# Altium PCB MainBoardPCB_PWR.PcbDoc (part 28 of 29)
Units mm, origin at the board's own origin, x right, y up, seen from the top; angles counter-clockwise.
Board outline 333.63 x 349.38 mm, 16 copper layers (L1, L2 (GND), L3 (Sign), L4 (GND), L5 (Sign), L6 (PWR/GND), L7(PWR/GND), L8 (PWR/GND), L9 (PWR/GND), L10 (PWR/GND), L11 (PWR/GND), L12 (Sign), L13 (GND), L14 (Sign), L15 (GND), L16), stack 2.503 mm thick; 2187 components, 1615 nets, 7987 pads, 1695 vias.
Unrouted connection lines stored in the file: 4757.
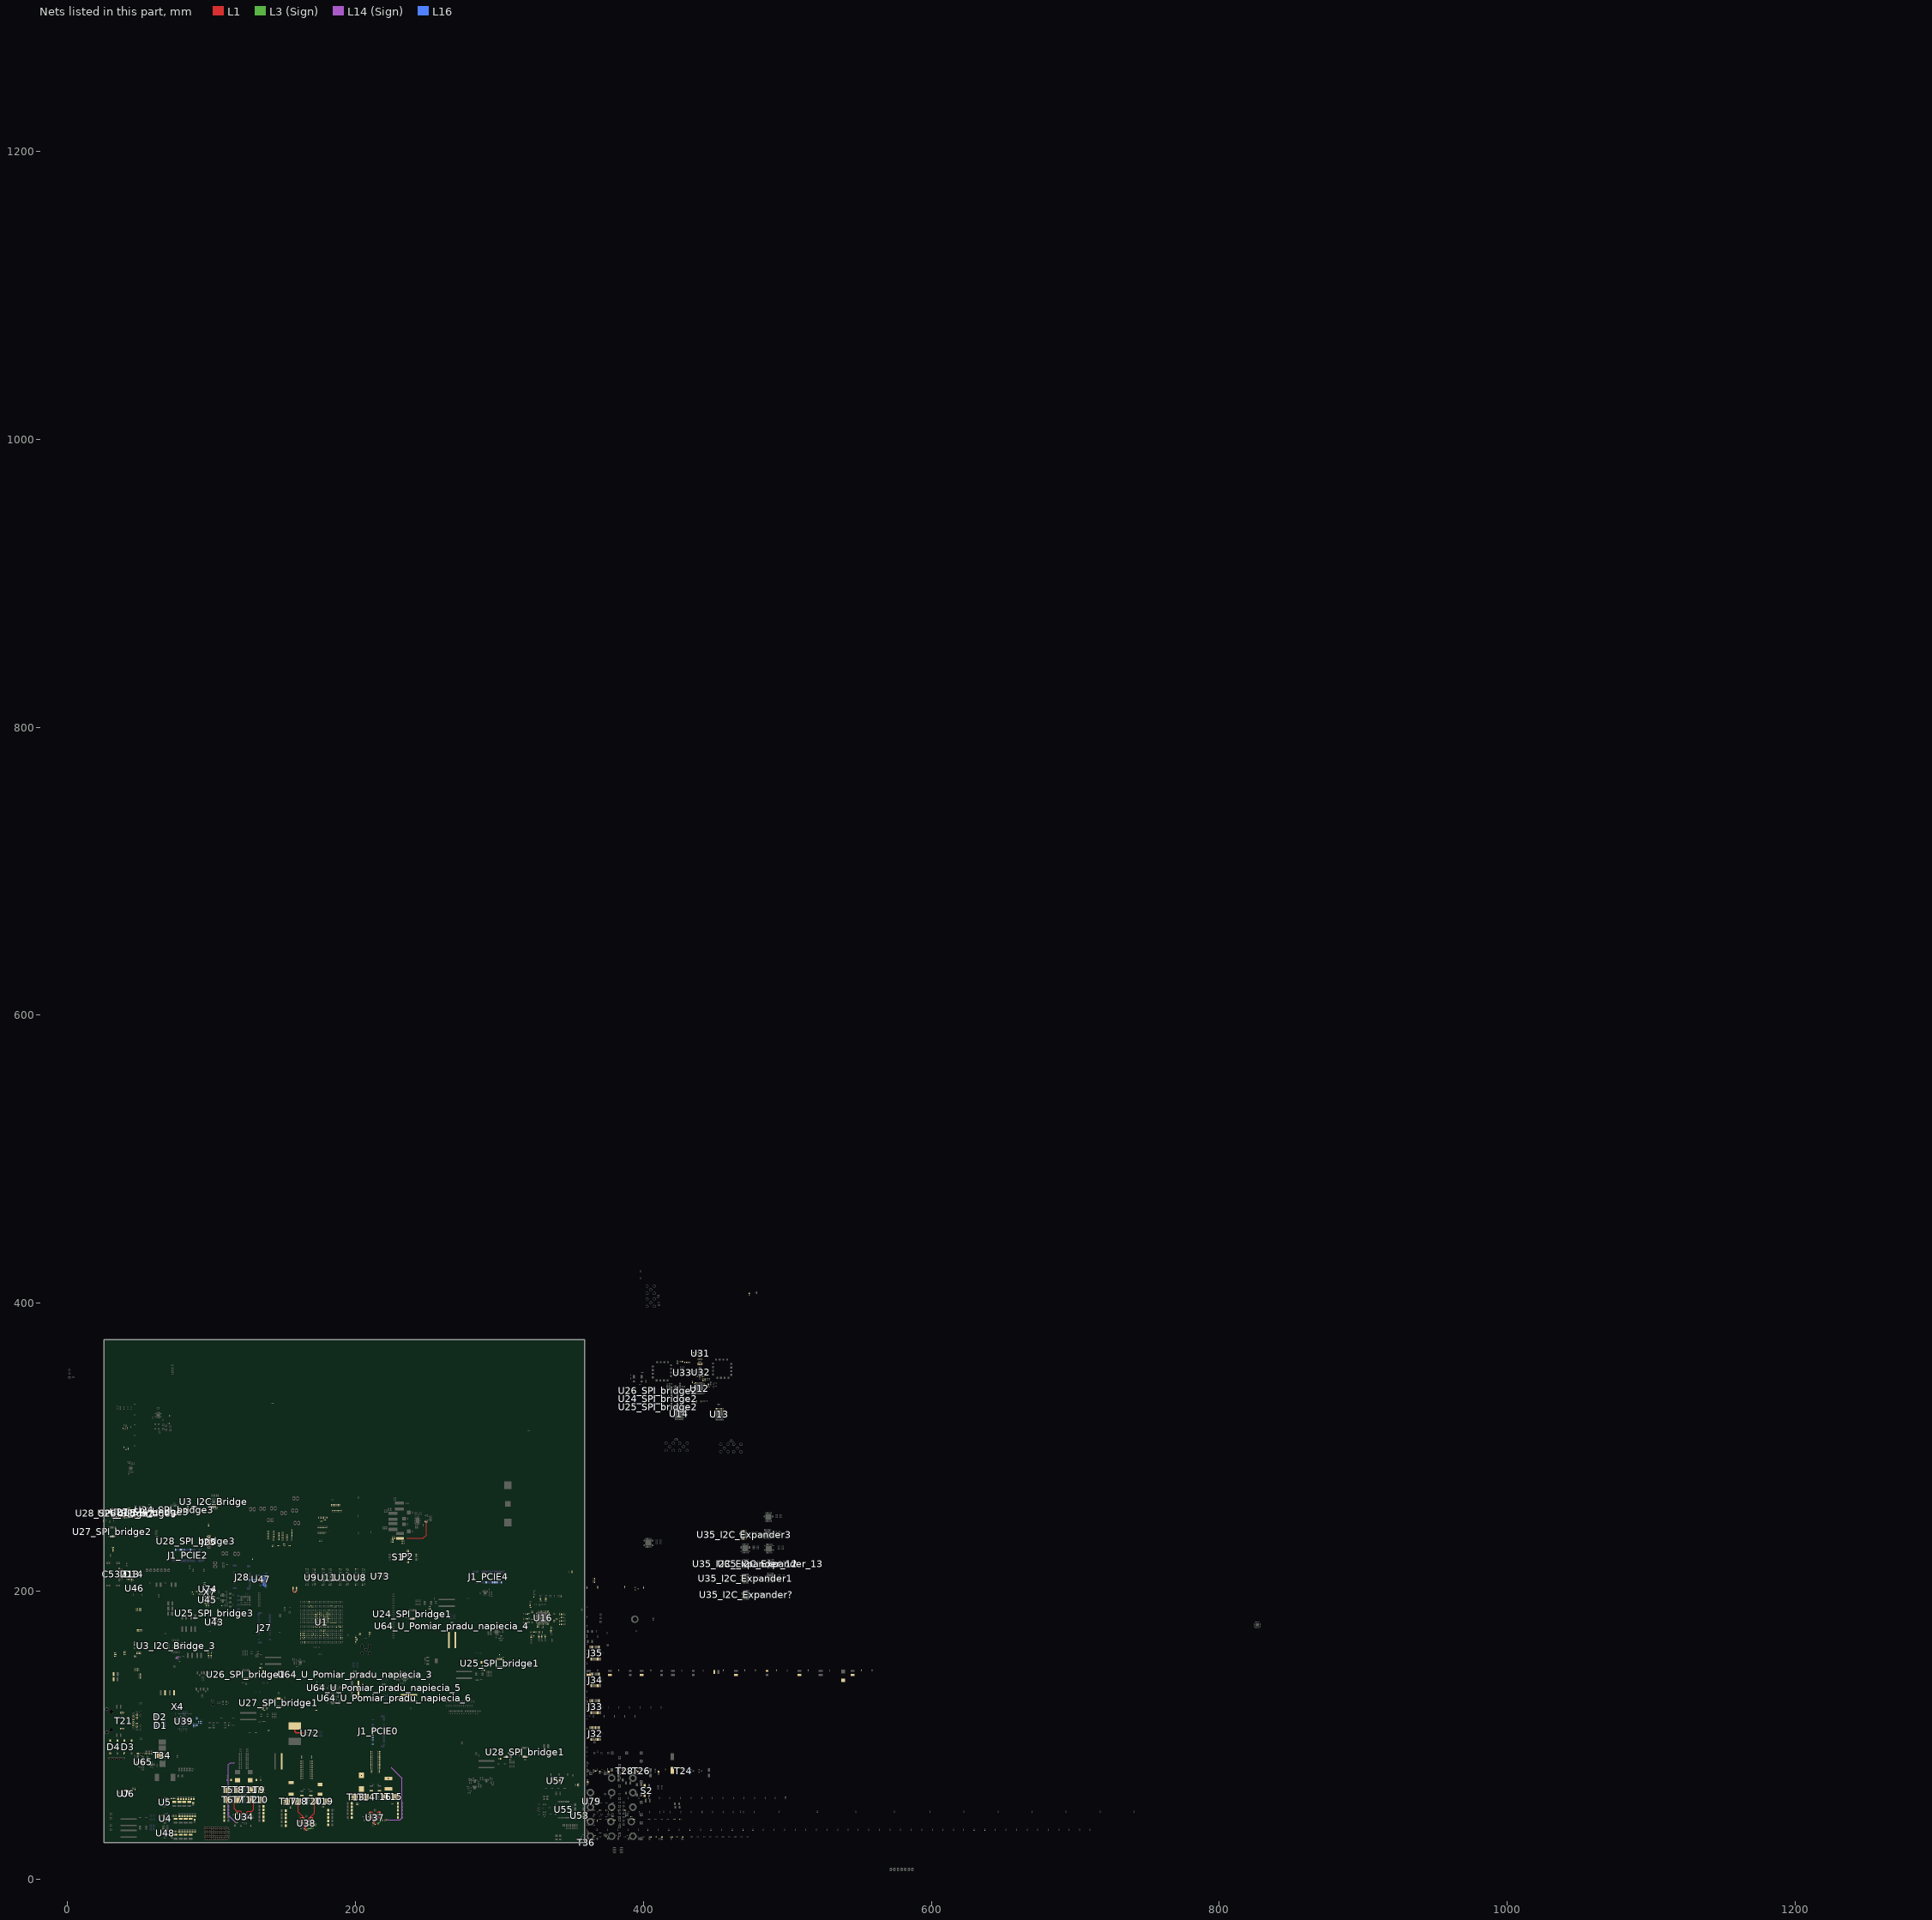
[diagram p23: the nets of this part, all layers, seen from the top]

## Via types
v1: diameter 0.5, hole 0.2, L1 to L16, 786 vias
v2: diameter 0.5/0.35/0.35/0.35/0.35/0.35/0.35/0.35/0.35/0.35/0.35/0.35/0.35/0.35/0.35/0.5 (per signal layer), hole 0.15, L1 to L16, tented both sides, 164 vias
v3: diameter 2.54, hole 1.02, L1 to L16, 152 vias
v4: diameter 0.5/0.35/0.35/0.35/0.35/0.35/0.35/0.35/0.35/0.35/0.35/0.35/0.35/0.35/0.35/0.5 (per signal layer), hole 0.2, L1 to L16, tented both sides, 100 vias
v5: diameter 0.45, hole 0.15, L1 to L16, 79 vias
v6: diameter 0.35/0/0.35 (per signal layer), hole 0.127, L1 to L3 (Sign), tented both sides, 78 vias
v7: diameter 0.45/0.45/0.45/0.45/0.45/0.45/0.45/0.45/0.45/0.45/0.45/0.45/0.45/0.45/0.45/0.45 (per signal layer), hole 0.15, L1 to L16, 65 vias
v8: diameter 0.4, hole 0.15, L1 to L16, 61 vias
v9: diameter 0.2, hole 0.1, L1 to L16, 35 vias
v10: diameter 0.5, hole 0.2, L1 to L16, tented both sides, 32 vias
v11: diameter 0.2/0/0.2 (per signal layer), hole 0.1, L1 to L3 (Sign), 28 vias
v12: diameter 0.4, hole 0.2, L1 to L16, 16 vias
v13: diameter 0.25, hole 0.2, L1 to L16, 16 vias
v14: diameter 0.3, hole 0.2, L1 to L16, 15 vias
v15: diameter 0.5/0.35/0.35/0.35/0.35/0.35/0.35/0.35/0.35/0.35/0.35/0.35/0.35/0.35/0.35/0.45 (per signal layer), hole 0.15, L1 to L16, tented both sides, 10 vias
v16: diameter 5, hole 3, L1 to L16, 9 vias
v17: diameter 0.2/0/0.2 (per signal layer), hole 0.1, L1 to L3 (Sign), tented both sides, 9 vias
v18: diameter 0.35/0/0.35 (per signal layer), hole 0.127, L1 to L3 (Sign), 7 vias
v19: diameter 0.35/0/0.35 (per signal layer), hole 0.127, L14 (Sign) to L16, tented both sides, 5 vias
v20: diameter 1.65, hole 1.65, L1 to L16, 4 vias
v21: diameter 1.15, hole 1.15, L1 to L16, 4 vias
v22: diameter 0.35, hole 0.127, L1 to L2 (GND), 2 vias
v23: diameter 0.4, hole 0.2, L1 to L16, tented both sides, 2 vias
v24: diameter 0.35, hole 0.127, L1 to L2 (GND), tented both sides, 2 vias
v25: diameter 0.508, hole 0.127, L1 to L2 (GND), 2 vias
v26: diameter 0.508, hole 0.127, L2 (GND) to L3 (Sign), 2 vias
v27: diameter 0.35, hole 0.127, L3 (Sign) to L6 (PWR/GND), tented both sides, 2 vias
v28: diameter 0.5, hole 0.2, L3 (Sign) to L6 (PWR/GND), tented both sides, 2 vias
v29: diameter 5.5, hole 3.5, L1 to L16, 1 vias
v30: diameter 0.45/0.45/0.45 (per signal layer), hole 0.15, L1 to L3 (Sign), 1 vias
v31: diameter 0.35/0.35/0.35 (per signal layer), hole 0.127, L1 to L3 (Sign), tented both sides, 1 vias
v32: diameter 0.45/0/0.45 (per signal layer), hole 0.15, L1 to L3 (Sign), tented both sides, 1 vias
v33: diameter 0.45/0/0.45 (per signal layer), hole 0.2, L14 (Sign) to L16, tented both sides, 1 vias
v34: diameter 0.35, hole 0.127, L2 (GND) to L3 (Sign), 1 vias

## Nets (pads, with @x,y where several pads share a name; then routed paths per layer and width w, separated by ;. In a path a pad name is that pad's centre, name@x,y a point inside that pad or via, vN(x,y) a via of type N, cw(c..) or ccw(c..) an arc to the next point about the centre after c; other vN are vias at no path point) (continued)
PWR_OUT_20V: C347.2 C348.2 C352.2 C353.2 C371.2 C372.2 C373.2 C374.2 C375.2 C376.2 C391.1 C392.2 C396.2 C397.1 C400.2 C401.2 C402.2 C403.2 C404.2 C405.2 C432.1 C433.2 C437.2 C438.1 C441.2 C442.2 C443.2 C444.2 C445.2 C446.2 C766.1 C767.1 C768.1 C769.1 C770.2 C771.2 C772.2 C773.2 C774.2 C775.2 C776.2 C777.2 C778.2 C779.2 C780.2 C781.2 R266.2 R268.1 R285.1 R303.1 R612.2 R614.2 R621.2 R622.2 R628.2 R686.2 T5.5 T5.6 T5.7 T5.8 T6.5 T6.6 T6.7 T6.8 T9.5 T9.6 T9.7 T9.8 T10.5 T10.6 T10.7 T10.8 T13.5 T13.6 T13.7 T13.8 T15.5 T15.6 T15.7 T15.8 T17.5 T17.6 T17.7 T17.8 T19.5 T19.6 T19.7 T19.8 U48.1 U48.8
  other v1: 95.25,27.75 96,27.75 96.75,27.75 97.5,27.75 98.25,27.75 99,27.75 99.75,27.75 100.5,27.75 101.25,27.75 102,27.75 102.75,27.75 103.5,27.75 104.25,27.75 105,27.75 105.75,27.75 106.5,27.75 107.25,27.75 108,27.75 108.75,27.75 109.5,27.75 110.25,27.75 111,27.75 95.625,28.5 96.375,28.5 97.125,28.5 97.875,28.5 98.625,28.5 99.375,28.5 100.125,28.5 100.875,28.5 101.625,28.5 102.375,28.5 103.125,28.5 103.875,28.5 104.625,28.5 105.375,28.5 106.125,28.5 106.875,28.5 107.625,28.5 108.375,28.5 109.125,28.5 109.875,28.5 110.625,28.5 111.375,28.5 112.125,28.5 95.25,29.25 96,29.25 96.75,29.25 97.5,29.25 98.25,29.25 99,29.25 99.75,29.25 100.5,29.25 101.25,29.25 102,29.25 102.75,29.25 103.5,29.25 104.25,29.25 105,29.25 105.75,29.25 106.5,29.25 107.25,29.25 108,29.25 108.75,29.25 109.5,29.25 110.25,29.25 111,29.25 111.75,29.25 95.625,30 96.375,30 97.125,30 97.875,30 98.625,30 99.375,30 100.125,30 100.875,30 101.625,30 102.375,30 103.125,30 103.875,30 104.625,30 105.375,30 106.125,30 106.875,30 107.625,30 108.375,30 109.125,30 109.875,30 110.625,30 111.375,30 112.125,30 95.25,30.75 96,30.75 96.75,30.75 97.5,30.75 98.25,30.75 99,30.75 99.75,30.75 100.5,30.75 101.25,30.75 102,30.75 102.75,30.75 103.5,30.75 104.25,30.75 105,30.75 105.75,30.75 106.5,30.75 107.25,30.75 108,30.75 108.75,30.75 109.5,30.75 110.25,30.75 111,30.75 111.75,30.75 95.625,31.5 96.375,31.5 97.125,31.5 97.875,31.5 98.625,31.5 99.375,31.5 100.125,31.5 100.875,31.5 101.625,31.5 102.375,31.5 103.125,31.5 103.875,31.5 104.625,31.5 105.375,31.5 106.125,31.5 106.875,31.5 107.625,31.5 108.375,31.5 109.125,31.5 109.875,31.5 110.625,31.5 111.375,31.5 112.125,31.5 95.25,32.25 96,32.25 96.75,32.25 97.5,32.25 98.25,32.25 99,32.25 99.75,32.25 100.5,32.25 101.25,32.25 102,32.25 102.75,32.25 103.5,32.25 104.25,32.25 105,32.25 105.75,32.25 106.5,32.25 107.25,32.25 108,32.25 108.75,32.25 109.5,32.25 110.25,32.25 111,32.25 111.75,32.25 95.625,33 96.375,33 97.125,33 97.875,33 98.625,33 99.375,33 100.125,33 100.875,33 101.625,33 102.375,33 103.125,33 103.875,33 104.625,33 105.375,33 106.125,33 106.875,33 107.625,33 108.375,33 109.125,33 109.875,33 110.625,33 111.375,33 112.125,33 95.25,33.75 96,33.75 96.75,33.75 97.5,33.75 98.25,33.75 99,33.75 99.75,33.75 100.5,33.75 101.25,33.75 102,33.75 102.75,33.75 103.5,33.75 104.25,33.75 105,33.75 105.75,33.75 106.5,33.75 107.25,33.75 108,33.75 108.75,33.75 109.5,33.75 110.25,33.75 111,33.75 111.75,33.75 95.625,34.5 96.375,34.5 97.125,34.5 97.875,34.5 98.625,34.5 99.375,34.5 100.125,34.5 100.875,34.5 101.625,34.5 102.375,34.5 103.125,34.5 103.875,34.5 104.625,34.5 105.375,34.5 106.125,34.5 106.875,34.5 107.625,34.5 108.375,34.5 109.125,34.5 109.875,34.5 110.625,34.5 111.375,34.5 112.125,34.5 95.25,35.25 96,35.25 96.75,35.25 97.5,35.25 98.25,35.25 99,35.25 99.75,35.25 100.5,35.25 101.25,35.25 102,35.25 102.75,35.25 103.5,35.25 104.25,35.25 105,35.25 105.75,35.25 106.5,35.25 107.25,35.25 108,35.25 108.75,35.25 109.5,35.25 110.25,35.25 111,35.25 111.75,35.25 95.625,36 96.375,36 97.125,36 97.875,36 98.625,36 99.375,36 100.125,36 100.875,36 101.625,36 102.375,36 103.125,36 103.875,36 104.625,36 105.375,36 106.125,36 106.875,36 107.625,36 108.375,36 109.125,36 109.875,36 110.625,36 111.375,36
  other v12: 67.617,31.412 68.417,31.412
PWR_Switch1_En: U6.A2 U35_I2C_Expander1.3
PWR_Switch1_Flag: U35_I2C_Expander1.2
PWR_Switch2_En: U7.A2 U35_I2C_Expander1.22
PWR_Switch2_Flag: U35_I2C_Expander1.18
PWR_SwitchR1_Flag: R29.1 U6.A3
PWR_SwitchR2_Flag: R30.1 U7.A3
RAM_DDR4_VTT: C722.2 C723.2 R31.2 R32.2 R33.2 R34.2 R35.2 R36.2 R37.2 R38.2 R39.2 R40.2 R41.2 R42.2 R43.2 R44.2 R45.2 R46.2 R47.2 R48.2 R49.2 R50.2 R51.2 R53.2 R55.2 R57.2 R59.2 R689.1 U73.8
RAM_Vcc1V2: C36.2 C220.1 C222.1 C223.2 C224.2 C225.2 C226.2 C227.2 C228.2 C229.2 C230.2 C231.2 C232.2 C233.2 C234.2 C235.2 C236.2 C237.2 C238.2 C239.2 C240.2 C241.2 C242.2 C244.1 C246.1 C247.2 C248.2 C249.2 C250.2 C251.2 C252.2 C253.2 C254.2 C255.2 C256.2 C257.2 C258.2 C259.2 C260.2 C261.2 C262.2 C263.2 C264.2 C265.2 C266.2 C741.2 C760.1 C761.2 R58.2 R165.2 R166.2 R169.2 R171.2 R297.2 R448_U_Pomiar_pradu_napiecia_4.2 R695.1 U1.A6 U1.B8 U1.C6 U1.D8 U1.E6 U1.G6 U1.J6 U1.L6 U1.M25 U1.N6 U1.R6 U1.T18 U1.T20 U1.T21 U1.U6 U8.A1 U8.A6 U8.B3 U8.B6 U8.C1 U8.D1 U8.D6 U8.F2 U8.F5 U8.G1 U8.G4 U8.G6 U8.J1 U8.J2 U8.J5 U8.J6 U8.L1 U8.L6 U8.R1 U8.T6 U9.A1 U9.A6 U9.B3 U9.B6 U9.C1 U9.D1 U9.D6 U9.F2 U9.F5 U9.G1 U9.G4 U9.G6 U9.J1 U9.J2 U9.J5 U9.J6 U9.L1 U9.L6 U9.R1 U9.T6 U10.A1 U10.A6 U10.B3 U10.B6 U10.C1 U10.D1 U10.D6 U10.F2 U10.F5 U10.G1 U10.G4 U10.G6 U10.J1 U10.J2 U10.J5 U10.J6 U10.L1 U10.L6 U10.R1 U10.T6 U11.A1 U11.A6 U11.B3 U11.B6 U11.C1 U11.D1 U11.D6 U11.F2 U11.F5 U11.G1 U11.G4 U11.G6 U11.J1 U11.J2 U11.J5 U11.J6 U11.L1 U11.L6 U11.R1 U11.T6 U64_U_Pomiar_pradu_napiecia_4.8 U64_U_Pomiar_pradu_napiecia_4.9 | length 50.7
  L1 w0.254: R297.2@221.201,41.215 222.24,41.215 v9(222.26,41.234)
  L14 (Sign) w0.254: v9(222.26,41.234) 231.218,41.234 232.456,42.473 232.456,69.878 v9@224.342,77.993
  L16 w0.254: v9@224.342,77.993 v9(224.342,77.996)
RAM_VrefA: C221.1 R166.1 R168.1 U8.M1
RAM_VrefB: C243.1 R169.1 R170.1 U10.M1
RAM_VrefC: C219.1 R165.1 R167.1 U9.M1
RAM_VrefD: C245.1 R171.1 R172.1 U11.M1
RefClk_Si53323_N: R253.1 R255.2 U31.7
RefClk_Si53323_P: C341.2 R252.1 R254.2 U31.6
RESET_N: R712.1 R713.2 U39.43
RESETB: U45.27 U74.4
RST_brigde: R757.1 U3_I2C_Bridge_3.24 U35_I2C_Expander?.28
SD_Card_CLK: J28.5 U47.C5 | length 6.8
  L16 w0.098: J28.5@126.749,207.781 129.739,207.781 130.112,208.153 U47.C5@133.439,208.153
SD_Card_en: R382.1 U47.C2
SetClk_Si53323_2: T36.1 U1.K12
SFP0_ABS: J32.6 R65.1
SFP0_LOS: J32.8 R66.1 U35_I2C_Expander3.28
SFP0_RS0: J32.7 R72.1 R74.2
SFP0_RS1: J32.9 R71.1 R73.2
SFP0_Rx_N: J32.19 U1.D5
SFP0_Rx_P: J32.18 U1.D6
SFP0_Tx_N: J32.12 U1.D1
SFP0_Tx_P: J32.13 U1.D2
SFP0_TxDis: J32.3 R68.1 U35_I2C_Expander3.27
SFP0_TxF: J32.2 R67.1 U35_I2C_Expander3.26
SFP0_VccR: C37.2 C38.1 J32.15 L1.2
SFP0_VccT: C39.2 C40.1 J32.16 L2.2
SFP1_ABS: J33.6 R135.1
SFP1_GND: R143.1 R144.1
SFP1_LOS: J33.8 R136.1 U35_I2C_Expander3.4
SFP1_RS0: J33.7 R142.1 R144.2
SFP1_RS1: J33.9 R141.1 R143.2
SFP1_Rx_N: J33.19 U1.C7 | length 2.1
  L14 (Sign) w0.072: 75.168,153.381 ccw(c75.168,156.118) 77.104,154.183
SFP1_Rx_P: J33.18 U1.C8 | length 2
  L14 (Sign) w0.072: 75.167,153.581 ccw(c75.167,156.121) 76.963,154.325
SFP1_Tx_N: J33.12 U1.C3
SFP1_Tx_P: J33.13 U1.C4
SFP1_TxDis: J33.3 R138.1 U35_I2C_Expander3.1
SFP1_TxF: J33.2 R137.1 U35_I2C_Expander3.24
SFP2_ABS: J34.6 R145.1
SFP2_GND: R153.1 R154.1
SFP2_LOS: J34.8 R146.1 U35_I2C_Expander3.3
SFP2_RS0: J34.7 R152.1 R154.2
SFP2_RS1: J34.9 R151.1 R153.2
SFP2_Rx_N: J34.19 U1.B5
SFP2_Rx_P: J34.18 U1.B6
SFP2_Tx_N: J34.12 U1.B1
SFP2_Tx_P: J34.13 U1.B2
SFP2_TxDis: J34.3 R148.1 U35_I2C_Expander3.17
SFP2_TxF: J34.2 R147.1 U35_I2C_Expander3.19
SFP3_ABS: J35.6 R155.1
SFP3_GND: R163.1 R164.1
SFP3_LOS: J35.8 R156.1 U35_I2C_Expander3.21
SFP3_RS0: J35.7 R162.1 R164.2
SFP3_RS1: J35.9 R161.1 R163.2
SFP3_Rx_N: J35.19 U1.A7
SFP3_Rx_P: J35.18 U1.A8
SFP3_Tx_N: J35.12 U1.A3
SFP3_Tx_P: J35.13 U1.A4
SFP3_TxDis: J35.3 R158.1 U35_I2C_Expander3.18
SFP3_TxF: J35.2 R157.1 U35_I2C_Expander3.2
SFP_IO_nReset: R756.1 U35_I2C_Expander3.14 U35_I2C_Expander?.1
SGMI_C_Rx_N: C484.1 U1.G26
SGMI_C_Rx_P: C483.1 U1.G25
SGMI_C_Tx_N: C482.1 U1.G30
SGMI_C_Tx_P: C479.1 U1.G29
SGMI_CLK_Out_N: R320.1 R321.1 R326.2 U39.34
SGMI_CLK_Out_P: R319.1 R321.2 R325.2 U39.33
SGMI_Rx_N: C484.2 U39.28
SGMI_Rx_P: C483.2 U39.27
SGMI_Tx_N: C482.2 R323.1 R328.2 U39.36
SGMI_Tx_P: C479.2 R322.1 R327.2 U39.35
Si53323_1_Q1_N: C330.1 R249.1 U31.9
Si53323_1_Q1_P: C325.1 R246.2 U31.10
Si53323_1_Q2_LVDS_N: C725.2 R386.2 R387.2 U1.AK4
Si53323_1_Q2_LVDS_P: C724.2 U1.AJ4
Si53323_1_Q2_N: R301.1 R385.2 U31.12
Si53323_1_Q2_P: R291.1 R384.2 U31.11
Si53323_2_CLK1_N: C330.2 R245.2 R248.2 R251.2 U32.4
Si53323_2_CLK1_P: C325.2 R245.1 R247.2 R250.2 U32.3
Si53323_2_Q1_N: C54.2 R537.2 U32.10
Si53323_2_Q1_P: C53.2 R536.1 U32.9
Si53323_2_Q2_LVDS_N: C727.2 R486.2 R487.2
Si53323_2_Q2_LVDS_P: C726.2
Si53323_2_Q2_N: R483.1 R485.2 U32.12
Si53323_2_Q2_P: R482.1 R484.2 U32.11
SMCLK_PCIE0: J1_PCIE0.26 R559_I2C_Bridge.1 U3_I2C_Bridge.2
SMCLK_PCIE1: R227_I2C_Bridge.1 U3_I2C_Bridge.4
SMCLK_PCIE2: J1_PCIE2.26 R225_I2C_Bridge.1 U3_I2C_Bridge.6
SMCLK_PCIE3: R223_I2C_Bridge.1 U3_I2C_Bridge.8
SMCLK_PCIE4: J1_PCIE4.26 R9_I2C_Bridge.1 U3_I2C_Bridge.11
SMDAT_PCIE0: J1_PCIE0.28 R560_I2C_Bridge.1 U3_I2C_Bridge.1
SMDAT_PCIE1: R558_I2C_Bridge.1 U3_I2C_Bridge.3
SMDAT_PCIE2: J1_PCIE2.28 R226_I2C_Bridge.1 U3_I2C_Bridge.5
SMDAT_PCIE3: R224_I2C_Bridge.1 U3_I2C_Bridge.7
SMDAT_PCIE4: J1_PCIE4.28 R10_I2C_Bridge.1 U3_I2C_Bridge.10
SPI1_CLK: J25.1 R132.2 R803.1 U15.14 U24_SPI_bridge2.3 U24_SPI_bridge3.3 U25_SPI_bridge2.3 U25_SPI_bridge3.3 U26_SPI_bridge2.3 U26_SPI_bridge3.3 U27_SPI_bridge2.3 U27_SPI_bridge3.3 U28_SPI_bridge2.3 U28_SPI_bridge2.14 U28_SPI_bridge3.3
SPI1_CLK: 
SPI1_CS: J25.4 R123.1 R124.1 R806.1 U15.11 U24_SPI_bridge2.6 U24_SPI_bridge3.6 U25_SPI_bridge2.6 U25_SPI_bridge3.6 U26_SPI_bridge2.6 U26_SPI_bridge3.6 U27_SPI_bridge2.6 U27_SPI_bridge3.6 U28_SPI_bridge2.6 U28_SPI_bridge3.6
SPI1_MISO: J25.3 R807.1 U15.13 U24_SPI_bridge2.4 U24_SPI_bridge3.4 U25_SPI_bridge2.4 U25_SPI_bridge3.4 U26_SPI_bridge2.4 U26_SPI_bridge3.4 U27_SPI_bridge2.4 U27_SPI_bridge3.4 U28_SPI_bridge2.4 U28_SPI_bridge3.4
SPI1_MISO: U12.51 U26_SPI_bridge2.13
SPI1_MOSI: U35_I2C_Expander_13.19
SPI1_MOSI: J25.2 R808.1 U12.52 U15.12 U24_SPI_bridge2.5 U24_SPI_bridge3.5 U25_SPI_bridge2.5 U25_SPI_bridge3.5 U26_SPI_bridge2.5 U26_SPI_bridge2.12 U26_SPI_bridge3.5 U27_SPI_bridge2.5 U27_SPI_bridge3.5 U28_SPI_bridge2.5 U28_SPI_bridge3.5
SPI2_CLK: U13.50 U25_SPI_bridge2.14
SPI2_MISO: U13.51 U25_SPI_bridge2.13
SPI2_MOSI: U13.52 U25_SPI_bridge2.12
SPI3_CLK: U14.50 U24_SPI_bridge2.14
SPI3_MISO: U14.51 U24_SPI_bridge2.13
SPI3_MOSI: U14.52 U24_SPI_bridge2.12
SPI_05028_CS: U35_I2C_Expander_13.24
SPI_05028_CS: R125.2 R127.1 R139.2 R240_SPI_bridge2.1 U16.24 U28_SPI_bridge2.11
SPI_05028_MISO: R1.1 R2.2 R133.1 U16.60
SPI_6952_1_CS: U35_I2C_Expander_13.4
SPI_6952_1_CS: R236_SPI_bridge2.1 U12.1 U26_SPI_bridge2.11
SPI_6952_2_CS: R233_SPI_bridge2.1 U13.1 U25_SPI_bridge2.11
SPI_6952_3_CS: R231_SPI_bridge2.1 U14.1 U24_SPI_bridge2.11
SPI_CLK_PCIE0: J1_PCIE0.22 U24_SPI_bridge1.14
SPI_CLK_PCIE1: U25_SPI_bridge1.14
SPI_CLK_PCIE2: J1_PCIE2.22 U26_SPI_bridge1.14
SPI_CLK_PCIE3: U27_SPI_bridge1.14
SPI_CLK_PCIE4: J1_PCIE4.22 U28_SPI_bridge1.14
SPI_CNV: U35_I2C_Expander_13.28
SPI_DAC_CS: R236_SPI_bridge3.1 U26_SPI_bridge3.11 U30.14
SPI_DAC_CS: U35_I2C_Expander_13.1
SPI_FPGA_CLK: U1.AB15 U15.3
SPI_FPGA_CS: R365.2 U1.AG13 U15.6
SPI_FPGA_MISO: U1.AD15 U15.4
SPI_FPGA_MOSI: U1.AE15 U15.5
SPI_FPGA_nOE: U15.9
SPI_MISO_PCIE0: J1_PCIE0.18 U24_SPI_bridge1.13
SPI_MISO_PCIE1: U25_SPI_bridge1.13
SPI_MISO_PCIE2: J1_PCIE2.18 U26_SPI_bridge1.13
SPI_MISO_PCIE3: U27_SPI_bridge1.13
SPI_MISO_PCIE4: J1_PCIE4.18 U28_SPI_bridge1.13
SPI_MOSI_PCIE0: J1_PCIE0.20 U24_SPI_bridge1.12
SPI_MOSI_PCIE1: U25_SPI_bridge1.12
SPI_MOSI_PCIE2: J1_PCIE2.20 U26_SPI_bridge1.12
SPI_MOSI_PCIE3: U27_SPI_bridge1.12
SPI_MOSI_PCIE4: J1_PCIE4.20 U28_SPI_bridge1.12
SPI_nCS_1_PCIE0: J1_PCIE0.16 R231_SPI_bridge1.1 U24_SPI_bridge1.11
SPI_nCS_1_PCIE1: R233_SPI_bridge1.1 U25_SPI_bridge1.11
SPI_nCS_1_PCIE2: J1_PCIE2.16 R236_SPI_bridge1.1 U26_SPI_bridge1.11
SPI_nCS_1_PCIE3: R238_SPI_bridge1.1 U27_SPI_bridge1.11
SPI_nCS_1_PCIE4: J1_PCIE4.16 R240_SPI_bridge1.1 U28_SPI_bridge1.11
SPI_nCS_2_PCIE0: J1_PCIE0.14
SPI_nCS_2_PCIE1: 
SPI_nCS_2_PCIE2: J1_PCIE2.14
SPI_nCS_2_PCIE3: 
SPI_nCS_2_PCIE4: J1_PCIE4.14
SPI_PCIE_SWITCH: U35_I2C_Expander_12.1
SPI_RESET: U35_I2C_Expander_13.25
SS1_1: C639.2 U37.28 | length 1.7
  L1 w0.254: C639.2@209.831,42.359 209.836,42.359 210.28,42.803 210.566,42.803 210.623,42.859 U37.28@211.295,42.859
SS1_2: C647.2 U38.28 | length 1.6
  L1 w0.254: C647.2@162.233,39.015 U38.28@163.783,39.015
SS2_1: C640.2 U37.13 | length 1.6
  L1 w0.254: U37.13@215.795,42.859 216.212,42.859 216.712,42.359 C640.2@217.165,42.359
SS2_2: C648.2 U38.13 | length 1.5
  L1 w0.254: U38.13@168.283,39.015 168.896,39.015 169.108,38.803 C648.2@169.734,38.803
SUSCLK: J27.60
SW1: C346.2 L9.1 R610.2 R613.2 T5.1 T5.2 T5.3 T6.1 T6.2 T6.3 T7.5 T7.6 T7.7 T7.8 T8.5 T8.6 T8.7 T8.8 U34.24 | length 13.3
  L1 w0.254: T7.8@115.802,53.156 115.802,48.85 117.646,47.007 ; R610.2@117.646,45.463 C346.2@117.646,46.421 117.646,47.007 ; U34.24@120.977,45.406 120.977,46.41 120.066,47.321 117.96,47.321 117.646,47.007
SW1_1: C390.2 L11.1 R288.2 R619.2 T13.1 T13.2 T13.3 T14.5 T14.6 T14.7 T14.8 U37.24 | length 5.1
  L1 w0.254: R619.2@209.916,45.309 C390.2@209.916,46.316 209.921,46.316 210.064,46.459 210.064,46.691 210.259,46.886 211.495,46.886 211.795,46.586 U37.24@211.795,44.86
SW1_2: C431.2 L19.1 R306.2 R625.1 T17.1 T17.2 T17.3 T18.5 T18.6 T18.7 T18.8 U38.24 | length 17.3
  L1 w0.254: T18.8@160.326,53.955 160.327,46.511 163.383,43.454 C431.2@163.383,42.843 ; R625.1@161.618,42.063 161.618,42.439 162.023,42.843 C431.2@163.383,42.843 ; U38.24@164.283,41.015 164.283,42.671 164.135,42.82 163.406,42.82 C431.2@163.383,42.843
SW2: C350.2 L10.1 R611.2 R616.2 T9.1 T9.2 T9.3 T10.1 T10.2 T10.3 T11.5 T11.6 T11.7 T11.8 T12.5 T12.6 T12.7 T12.8 U34.17 | length 13.1
  L1 w0.254: U34.17@124.477,45.406 124.477,46.169 125.246,46.938 127.646,46.938 127.794,46.789 ; R611.2@127.969,45.198 127.969,45.986 127.799,46.156 C350.2@127.794,46.156 127.794,46.789 ; T12.5@129.177,53.156 129.177,48.172 127.794,46.789
SW2_1: C394.2 L12.1 R298.2 R620.2 T15.1 T15.2 T15.3 T16.5 T16.6 T16.7 T16.8 U37.17 | length 5
  L1 w0.254: U37.17@215.295,44.86 215.295,46.212 216.119,47.036 216.706,47.036 216.978,46.764 216.978,46.382 C394.2@217.045,46.316 217.05,46.311 217.05,45.314 R620.2@217.055,45.309
SW2_2: C435.2 L20.1 R302.1 R316.2 T19.1 T19.2 T19.3 T20.5 T20.6 T20.7 T20.8 U38.17 | length 17.8
  L1 w0.254: U38.17@167.783,41.015 167.783,42.456 168.186,42.858 C435.2@168.633,42.858 ; R302.1@170.334,41.515 170.334,42.698 170.174,42.858 C435.2@168.633,42.858 ; T20.8@171.578,54.055 171.578,45.807 168.633,42.863 C435.2@168.633,42.858
SYNC_PCIE0_N: J1_PCIE0.46 U1.AJ12
SYNC_PCIE0_P: J1_PCIE0.44 U1.AH12
SYNC_PCIE1_N: U1.AF11
SYNC_PCIE1_P: U1.AF12
SYNC_PCIE2_N: J1_PCIE2.46 U1.AH11
SYNC_PCIE2_P: J1_PCIE2.44 U1.AG11
SYNC_PCIE3_N: U1.AK11
SYNC_PCIE3_P: U1.AJ11
SYNC_PCIE4_N: J1_PCIE4.46 U1.AK10
SYNC_PCIE4_P: J1_PCIE4.44 U1.AJ10
TD_A_N: D1.2 D1.7 T21.10 U39.2
TD_A_P: D1.1 D1.8 T21.11 U39.1
TD_B_N: D1.4 D1.5 T21.5 U39.5
TD_B_P: D1.3 D1.6 T21.4 U39.4
TD_C_N: D2.2 D2.7 T21.2 U39.8
TD_C_P: D2.1 D2.8 T21.3 U39.7
TD_D_N: D2.4 D2.5 T21.9 U39.11
TD_D_P: D2.3 D2.6 T21.8 U39.10
TRK1_1: U37.32
TRK1_2: U38.32
TRK2_1: U37.9
TRK2_2: U38.9
TTC_0: R810.1
TTC_3: R804.1
uart0_RxD: R779.1 U57.13
uart0_TxD: R778.1 U57.14
uart1_RxD: U1.AH13 U79.14
uart1_TxD: U1.AK13 U79.13
US+_DxN: R279.1 R286.1 U1.V15
US+_DxP: R282.1 R283.1 U1.V14
US+_GND_PS_ADC: C627.1 C628.1 FB39.2 U1.W21
US+_GNDADC: C629.1 C630.1 FB41.2 U1.R14 U1.U14 U1.U15
US+_MGTRref: R173.1 U1.K7
US+_MGTRref_K8: R695.2 U1.K8
US+_POR_OVE: R693.1 U1.Y6
US+_Pudc_B: R694.2 R696.1 U1.W7
US+_Vcc_PS_ADC: C627.2 C628.2 FB38.2 U1.W22
US+_Vcc_PS_Batt: B1.1 C747.1 C748.2 R276.1 U1.U20
US+_Vcc_PS_DDR_504: C616.2 C617.2 C618.2 C619.2 C620.2 C621.2 C622.2 C753.1 C754.2 C755.2 L18.2 R220.2 U1.AA24 U1.AB27 U1.AC25 U1.AD28 U1.AE26 U1.AG27 U1.AK26 | length 24.7
  L1 w0.254: 235.547,236.679 247.007,236.679 249.205,238.876 249.205,247.974 R220.2@249.13,248.049 248.58,248.049 248.33,248.298 C616.2@248.32,248.298
US+_Vcc_PS_DDR_PLL: C631.2 C632.2 FB42.2 U1.U18 U1.U19
US+_Vcc_PS_IntFp: C738.1 C739.1 C740.2 C744.2 C745.2 C751.1 C752.2 C762.1 C763.2 R271.2 R617.2 U1.AA18 U1.AA20 U1.AA21 U1.AA22 U1.L11 U1.L13 U1.L17 U1.M12 U1.M14 U1.M16 U1.M18 U1.N11 U1.N13 U1.N15 U1.N17 U1.P12 U1.P14 U1.P16 U1.R10 U1.R11 U1.R13 U1.R17 U1.T9 U1.T10 U1.T12 U1.T16 U1.U8 U1.U9 U1.U10 U1.U11 U1.U13 U1.U17 U1.V8 U1.V10 U1.V12 U1.V16 U1.V17 U1.V18 U1.V19 U1.W11 U1.W13 U1.W15 U1.W17 U1.W19 U1.W20 U1.Y12 U1.Y14 U1.Y16 U1.Y17 U1.Y18 U1.Y19 U1.Y20 U1.Y22 U72.8 U72.9 | length 57.3
  L1 w0.164: 161.617,101.632 161.712,101.728 163.858,101.728
  L1 w0.912: R617.2@157.952,106.38 157.952,102.49 158.81,101.632 161.617,101.632
  L14 (Sign) w0.254: 113.053,80.785 v9(115.802,80.785) ; 113.12,80.758 111.8,79.439 111.8,44.287 v1@116.988,39.099
  other v1: 116.921,39.126
US+_Vcc_PS_IntFpDDR: C764.1 C765.2
US+_VccADC: C629.2 C630.2 FB40.2 U1.R15
US+_VN: U1.T15
US+_VP: U1.T14
US_JTAG_CLK: U53.12
US_JTAG_TDI: U53.14
US_JTAG_TDO: U53.11
US_JTAG_TMS: U53.13
US_JTAG_Vcc: U53.15
US_PADI: C535.2 R374.1 U1.M21 X5.1 | length 3.5
  L1 w0.2: X5.1@156.644,202.242 X5.1@156.624,202.222 C535.2@156.624,200.432 156.624,199.714 156.999,199.339 R374.1@157.424,199.339
US_PADO: C536.2 R374.2 U1.N21 X5.2 | length 3.5
  L1 w0.2: R374.2@158.324,199.339 158.749,199.339 159.124,199.714 C536.2@159.124,200.432 X5.2@159.124,202.222
US_PS_DONE: R357.1 U1.N22 U43.6
US_PS_Err_Out: U1.R22 U43.3
US_PS_Err_Status: U1.R20 U43.4
US_PS_Init_B: R353.2 U1.N18 U43.5
US_PS_JTAG_TCK: R346.2 U1.L19
US_PS_JTAG_TDI: R347.2 U1.L20
US_PS_JTAG_TDO: U1.M20
US_PS_JTAG_TMS: R348.2 U1.L21
US_PS_Mode0: P2.4 R349.1 S1.1 U1.R18
US_PS_Mode2: P2.2 R351.1 S1.3 U1.P21
US_PS_Mode3: P2.1 R352.1 S1.4 U1.P22
US_PS_Prog_B: R356.2 R367.1 S2.1 S2.2 U1.M19
US_PS_Ref_Clk: R375.2 U1.P19
USB2_CLK: R362.2 U45.1
USB2_D0: R116.2 U45.3
USB2_D1: R117.2 U45.4
USB2_D2: R115.2 U45.5
USB2_D3: R119.2 U45.6
USB2_D4: R120.2 U45.7
USB2_D5: R121.2 U45.9
USB2_D6: R122.2 U45.10
USB2_D7: R802.1 U45.13
USB2_DIR: R800.1 U45.31
USB2_NXT: R801.1 U45.2
USB2_STP: R118.2 U45.29
USB_D_N: C537.2 D13.2 U45.19
USB_D_P: C537.3 D13.1 U45.18
USB_En_Vout: U45.17 U46.A2
USB_OSC_IN: C736.2 R491.1 U45.26 X7.1
USB_OSC_Out: C737.2 R491.2 U45.25 X7.3
USB_RS0: R376.1 U45.8
USB_RS1: R377.1 U45.11
USB_RS2: R378.1 U45.14
USB_RX_C_N: C537.5 C543.2 D14.1 D14.10
USB_RX_C_P: C537.6 C542.2 D14.2 D14.9
USB_RX_N: C543.1 U1.J26
USB_RX_P: C542.1 U1.J25
USB_TX_C_N: C537.8 C541.2 D14.4 D14.7
USB_TX_C_P: C537.9 C540.2 D14.5 D14.6
USB_TX_N: C541.1 U1.H28
USB_TX_P: C540.1 U1.H27
USB_Vbus: R490.1 U45.22
USB_Vdd33: C731.2 U45.20
USB_Vout: C538.2 C539.2 C734.2 FB26.1 R490.2 U46.C2 U46.D1 U46.D2 U46.E1 U46.E2 U46.F1 U46.F2
uSD_CLK: R96.2 R97.1 U47.C1 | length 2.8
  L16 w0.098: U47.C1@135.039,208.153 135.928,208.153 136.436,207.645 R96.2@137.599,207.645
uSD_CMD: R95.2 U47.D2 | length 5.4
  L14 (Sign) w0.098: v19(134.639,207.753) 135.579,207.753 136.516,206.816 v19(136.516,204.953)
  L16 w0.098: v19(136.516,204.953) 136.948,204.521 R95.2@137.599,204.521
uSD_D0: R87.2 U47.D1 | length 3.8
  L16 w0.098: U47.D1@135.039,207.753 135.336,207.753 136.231,206.858 136.231,206.326 136.995,205.562 R87.2@137.599,205.562
uSD_D1: R88.2 U47.E1 | length 5.5
  L16 w0.098: U47.E1@135.039,207.353 135.903,206.489 135.903,204.229 136.652,203.479 R88.2@137.599,203.479
uSD_D2: R89.2 U47.A1 | length 4.1
  L16 w0.098: U47.A1@135.039,208.953 135.039,210.223 135.585,210.769 R89.2@137.599,210.769
uSD_D3: R90.2 U47.B1 | length 2.6
  L16 w0.098: U47.B1@135.039,208.553 135.299,208.553 135.433,208.686 R90.2@137.599,208.686
uSD_D4: R91.2 U47.B2 | length 3.5
  L14 (Sign) w0.098: v19(134.639,208.553) 134.639,208.693 v19(135.611,209.664)
  L16 w0.098: v19(135.611,209.664) 135.679,209.664 135.742,209.728 R91.2@137.599,209.728
V_KEY: C609.2 R647.2 R648.1 R653.1 T24.1 T26.1 T28.1
V_PoE+: C595.2 C596.2 D3.1 D4.1 D27.1 R149.2 R324.2 T34.5 U65.18
  other v5: 65.48,85.852 63.03,85.889 39.675,86.991 58.578,87.219 29.683,87.244 54.875,87.307 56.704,87.317
  other v7: 29.25,83.25 30,83.25 30.75,83.25 31.5,83.25 32.25,83.25 33,83.25 33.75,83.25 34.5,83.25 35.25,83.25 36,83.25 36.75,83.25 37.5,83.25 38.25,83.25 39,83.25 28.875,84 29.625,84 30.375,84 31.125,84 31.875,84 32.625,84 33.375,84 34.125,84 34.875,84 35.625,84 36.375,84 37.125,84 37.875,84 38.625,84 39.375,84 50.25,87 51,87 51.75,87 52.5,87 53.25,87
VBB: C344.1 R257.1 U33.3 U33.4
VC1~: D3.4 T21.13
VC2~: D3.3 T21.14
VC3~: D4.4 T21.15
VC4~: D4.3 T21.16
Vcc_Aux_PCIE_PCIE0: C1_PCIE0.2 C2_PCIE0.2 C3_PCIE0.2 FB1_PCIE0.1 J1_PCIE0.2 J1_PCIE0.4
Vcc_Aux_PCIE_PCIE1: C1_PCIE1.2 C2_PCIE1.2 C3_PCIE1.2 FB1_PCIE1.1
Vcc_Aux_PCIE_PCIE2: C1_PCIE2.2 C2_PCIE2.2 C3_PCIE2.2 FB1_PCIE2.1 J1_PCIE2.2 J1_PCIE2.4
Vcc_Aux_PCIE_PCIE3: C1_PCIE3.2 C2_PCIE3.2 C3_PCIE3.2 FB1_PCIE3.1
Vcc_Aux_PCIE_PCIE4: C1_PCIE4.2 C2_PCIE4.2 C3_PCIE4.2 FB1_PCIE4.1 J1_PCIE4.2 J1_PCIE4.4
Vcc_CLK_Mux_Fine: C326.2 C327.2 C328.2 C329.2 FB23.2 R250.1 R251.1 R259.1 R260.1 R386.1 R486.1 R488.2 U31.5 U32.5
Vcc_SFP_0: R155.2 R156.2 R157.2 R158.2 R161.2 R162.2
VCCINT: C598.2 D26.2 R669.1 U65.4 U65.14 | length 3.4
  L1 w0.254: 47.095,80.629 47.099,80.633 48.073,80.633 R669.1@48.076,80.636 49.503,80.636 49.574,80.707 U65.4@50.492,80.707
VCCO_1: C398.2 R289.2 R293.1 R295.1 R296.1 U37.2 U37.4 | length 13.9
  L1 w0.254: U37.2@212.295,40.359 C398.2@212.295,39.006 212.864,39.006 213.268,39.41 ; U37.4@213.295,40.359 213.295,39.83 213.268,39.803 213.268,39.41 ; R293.1@214.795,38.066 R289.2@213.795,38.066 213.445,38.066 213.268,38.243 213.268,39.41 ; R296.1@218.005,43.359 v11(218.43,43.359)
  L3 (Sign) w0.254: v11(214.795,38.016) 215.366,38.016 218.522,41.172 218.522,43.267 v11(218.43,43.359)
VCCO_2: C439.2 R307.2 R310.1 R313.1 R314.1 U38.2 U38.4 | length 16.8
  L1 w0.254: U38.2@164.783,36.515 164.783,35.792 164.703,35.712 ; R307.2@165.454,34.152 165.208,34.152 165.021,34.339 165.021,34.6 164.833,34.787 164.563,34.787 C439.2@164.433,34.917 164.433,35.442 164.703,35.712 ; R307.2@165.608,34.087 R310.1@166.533,34.087 v11(166.533,34.037) ; U38.4@165.783,36.515 165.783,35.992 165.504,35.712 164.703,35.712 ; R314.1@170.674,39.685 v11(171.099,39.685)
  L3 (Sign) w0.254: v11(166.533,34.037) 167.533,35.037 168.936,35.037 170.864,36.965 172.502,36.965 172.502,38.282 v11(171.099,39.685)
VDD_APLL1: C88.1 C110.2 FB13.2 U16.49
VDD_APLL2: C89.1 C127.2 FB15.2 U16.37
VDD_CLK_MUX_DIV_3.3V: C336.2 C337.2 C338.2 C340.2 FB24.2 U33.1 U33.8 U33.9 U33.12
VDD_DIG: C93.1 C165.2 C590.2 FB21.2 FB37.1 R1.2 R125.1 R127.2 R128.2 R366.1 R544.2 U16.8
VDD_IN0: C63.1 C101.2 FB8.2 U16.3
VDD_IN1: C64.1 C105.2 FB10.2 U16.16
VDD_IN2: C67.1 C109.2 FB12.2 U16.9
VDD_IN3: C70.1 C126.2 FB14.2 U16.4
VDD_TCXO: C92.1 C148.2 FB19.2 U16.19
VDD_XO: C90.1 C144.2 FB17.2 U16.42
VDDO_0: C75.1 C143.2 FB16.2 U16.21
VDDO_1: C76.1 C147.2 FB18.2 U16.25
VDDO_6: C77.1 C164.2 FB20.2 U16.59
VDDO_7: C81.1 C180.2 FB22.2 U16.63
VDDO_23: C82.1 C102.2 FB9.2 U16.30
VDDO_45: C83.1 C106.2 FB11.2 U16.50
VLDO: C544.2 R383.2 U47.B4
Vout1_1: C406.2 C407.2 C408.2 C409.2 C410.2 C411.2 C412.2 C413.2 C414.2 C415.2 C416.2 C417.2 L11.2 R448_U_Pomiar_pradu_napiecia_3.1 U64_U_Pomiar_pradu_napiecia_3.10 | length 0
  L16 w0.254: 194.963,41.245 194.982,41.265
  other v5: 204.133,72.064
Vout1_2: C447.2 C448.2 C449.2 C450.2 C451.2 C452.2 C453.2 C454.2 C455.2 C456.2 C457.2 C458.2 L19.2 R448_U_Pomiar_pradu_napiecia_5.1 U64_U_Pomiar_pradu_napiecia_5.10
Vout2_1: C418.2 C419.2 C420.2 C421.2 C422.2 C423.2 C424.2 C425.2 C426.2 C427.2 C428.2 C429.2 L12.2 R448_U_Pomiar_pradu_napiecia_4.1 U64_U_Pomiar_pradu_napiecia_4.10
  other v5: 222.802,69.878
Vout2_2: C459.2 C460.2 C461.2 C462.2 C463.2 C464.2 C465.2 C466.2 C467.2 C468.2 C469.2 C470.2
Vout_1_Selector: C4.1 C5.1 C6.1 C7.1 C8.2 C9.2 C10.2 C11.2 C20.2 C21.2 C22.2 C23.2 C24.2 C25.2 C26.2 C27.2 R15.2 U4.7 U5.1 U5.8
  other v12: 67.41,42.35 67.229,53.095 68.029,53.095
Vout_2_Selector: C12.1 C13.1 C14.1 C15.1 C16.2 C17.2 C18.2 C19.2 C28.2 C29.2 C30.2 C31.2 C32.2 C33.2 C34.2 C35.2 R677.2 R678.2 U4.1 U4.8 U48.7
  other v12: 67.617,32.112 67.41,41.65 68.21,41.65
Vout_5V@10A_INA: L20.2 R448_U_Pomiar_pradu_napiecia_6.1 U64_U_Pomiar_pradu_napiecia_6.10 | length 0
  L16 w0.254: 185.2,48.06 185.204,48.06
VPHY_FTDI: C661.2 C662.2 FB44.2 U55.4
VPLL_FTDI: C659.2 C660.2 FB43.2 U55.9
VREF+_1: C61.2 C62.2 FB3.2 U12.44
VREF+_2: C73.2 C74.2 FB5.2 U13.44
VREF+_3: C57.2 C58.2 FB2.2 U14.44
VVCO+_1: C86.2 C87.2 FB6.2 U12.39
VVCO+_2: C97.2 C98.2 FB7.2 U13.39
VVCO+_3: C68.2 C69.2 FB4.2 U14.39
WR_LMK_CLK_HF1_N: U1.AK5 U16.26
WR_LMK_CLK_HF1_P: U1.AJ5 U16.27
WR_LMK_CLK_HF2_N: U1.AK2 U16.32
WR_LMK_CLK_HF2_P: U1.AK3 U16.31
WR_LMK_CLK_HF3_N: U16.33
WR_LMK_CLK_HF3_P: U16.34
WR_LMK_CLK_HF4_N: U16.52
WR_LMK_CLK_HF4_P: U16.51
WR_LMK_CLK_HF5_N: U16.53
WR_LMK_CLK_HF5_P: U16.54
WR_LMK_CLK_HF6_N: U16.58
WR_LMK_CLK_HF6_P: U16.57
WR_LMK_CLK_HF7_N: U16.61
WR_LMK_CLK_HF7_P: U16.62
WR_LMK_CLK_IN_N: C594.2 R311.1 U16.2
WR_LMK_CLK_IN_P: C593.2 R311.2 U16.1
WR_LMK_CLK_LF_N: U16.15 U16.23
WR_LMK_CLK_LF_P: U16.14 U16.22
WR_Source_CLK_N: C594.1 U13.6
WR_Source_CLK_P: C593.1 U13.7
X1: C481.2 R335.2 U39.14 X4.1
X2: C480.2 R335.1 U39.15 X4.3
XO_LMK05028_P: C589.2 U16.43
pads on no net: C558.4 D22.2 D28.1 J1_PCIE0.56 J1_PCIE0.58 J1_PCIE0.M J1_PCIE2.56 J1_PCIE2.58 J1_PCIE2.M J1_PCIE4.56 J1_PCIE4.58 J1_PCIE4.M J14.3 J27.5 J27.6 J27.7 J27.8 J27.11 J27.13 J27.17 J27.19 J27.20 J27.22 J27.23 J27.24 J27.25 J27.26 J27.28 J27.30 J27.32 J27.34 J27.36 J27.40 J27.42 J27.44 J27.46 J27.48 J27.56 J27.58 J27.59 J27.M J28.MH1 J28.MH2 J32. J33. J33.17 J34. J34.17 J35. J35.17 MP1_PCIE0.1 MP1_PCIE1.1 MP1_PCIE2.1 MP1_PCIE3.1 MP1_PCIE4.1 MP2_PCIE0.1 MP2_PCIE1.1 MP2_PCIE2.1 MP2_PCIE3.1 MP2_PCIE4.1 MP3_PCIE0.1 MP3_PCIE1.1 MP3_PCIE2.1 MP3_PCIE3.1 MP3_PCIE4.1 P12.11 R100.1 R100.2 R133.2 R134.2 R135.2 R136.2 R137.2 R138.2 R141.2 R142.2 R145.2 R146.2 R147.2 R148.2 R151.2 R152.2 R654.1 R776.1 R777.1 T21.MH1 T21.MH2 T35. U1.A12 U1.A13 U1.A14 U1.A15 U1.A16 U1.A17 U1.A19 U1.AA8 U1.AA16 U1.AA17 U1.AA26 U1.AA30 U1.AB5 U1.AB6 U1.AB8 U1.AB16 U1.AB18 U1.AB19 U1.AB20 U1.AB21 U1.AB29 U1.AC7 U1.AC8 U1.AC13 U1.AC16 U1.AC17 U1.AC18 U1.AC19 U1.AD7 U1.AD16 U1.AD17 U1.AD19 U1.AE7 U1.AE10 U1.AE12 U1.AE17 U1.AE18 U1.AE19 U1.AF1 U1.AF2 U1.AF13 U1.AF15 U1.AF16 U1.AF17 U1.AF18 U1.AG3 U1.AG4 U1.AG5 U1.AG6 U1.AG8 U1.AG9 U1.AG14 U1.AG15 U1.AG16 U1.AG18 U1.AG19 U1.AH1 U1.AH2 U1.AH3 U1.AH4 U1.AH6 U1.AH7 U1.AH8 U1.AH14 U1.AH16 U1.AH17 U1.AH18 U1.AJ6 U1.AJ7 U1.AJ14 U1.AJ15 U1.AJ16 U1.AJ17 U1.AJ27 U1.AK12 U1.AK14 U1.AK15 U1.AK16 U1.AK17 U1.AK18 U1.B12 U1.B14 U1.B15 U1.B16 U1.B19 U1.C12 U1.C13 U1.C14 U1.C16 U1.C17 U1.D12 U1.D14 U1.D15 U1.D16 U1.D17 U1.E12 U1.E13 U1.E14 U1.E15 U1.E17 U1.F12 U1.F13 U1.F15 U1.F16 U1.G13 U1.G14 U1.G15 U1.G16 U1.H12 U1.H13 U1.H14 U1.H16 U1.J12 U1.J14 U1.J15 U1.J16 U1.K11 U1.K13 U1.K14 U1.K15 U1.L14 U1.L15 U1.L25 U1.L26 U1.W9 U1.W10 U1.W26 U1.W27 U1.Y9 U1.Y27 U1.Y29 U1.Y30 U4.11 U5.11 U8.T4 U9.T4 U10.T4 U11.T4 U12.12 U12.13 U12.15 U12.16 U12.18 U12.19 U12.21 U12.22 U12.24 U12.25 U12.27 U12.28 U12.50 U13.9 U13.10 U13.12 U13.13 U13.15 U13.16 U13.18 U13.19 U13.21 U13.22 U13.24 U13.25 U13.27 U13.28 U13.30 U13.31 U13.33 U13.34 U13.42 U13.43 U14.42 U14.43 U16.5 U16.6 U16.10 U16.11 U16.18 U18.A3 U26_SPI_bridge2.14 U28_SPI_bridge2.12 U28_SPI_bridge2.13 U30.6 U30.7 U30.8 U31.3 U31.4 U31.8 U31.13 U31.14 U31.15 U31.16 U32.8 U32.13 U32.14 U32.15 U32.16 U33.7 U35_I2C_Expander1.7 U35_I2C_Expander1.10 U35_I2C_Expander2.7 U35_I2C_Expander2.10 U35_I2C_Expander3.7 U35_I2C_Expander3.10 U35_I2C_Expander?.7 U35_I2C_Expander?.10 U35_I2C_Expander_10.7 U35_I2C_Expander_10.10 U35_I2C_Expander_11.7 U35_I2C_Expander_11.10 U35_I2C_Expander_12.7 U35_I2C_Expander_12.10 U35_I2C_Expander_13.3 U35_I2C_Expander_13.7 U35_I2C_Expander_13.10 U35_I2C_Expander_13.22 U35_I2C_Expander_13.23 U35_I2C_Expander_14.7 U35_I2C_Expander_14.10 U35_I2C_Expander_15.7 U35_I2C_Expander_15.10 U35_I2C_Expander_16.7 U35_I2C_Expander_16.10 U39.18 U39.25 U39.26 U39.29 U39.32 U39.37 U39.38 U39.40 U40.6 U41.A1 U41.A2 U41.A7 U41.A8 U41.A9 U41.A10 U41.A11 U41.A12 U41.A13 U41.A14 U41.B1 U41.B7 U41.B8 U41.B9 U41.B10 U41.B11 U41.B12 U41.B13 U41.B14 U41.C1 U41.C3 U41.C5 U41.C7 U41.C8 U41.C9 U41.C10 U41.C11 U41.C12 U41.C13 U41.C14 U41.D1 U41.D2 U41.D3 U41.D4 U41.D12 U41.D13 U41.D14 U41.E1 U41.E2 U41.E3 U41.E5 U41.E8 U41.E9 U41.E10 U41.E12 U41.E13 U41.E14 U41.F1 U41.F2 U41.F3 U41.F10 U41.F12 U41.F13 U41.F14 U41.G1 U41.G2 U41.G3 U41.G10 U41.G12 U41.G13 U41.G14 U41.H1 U41.H2 U41.H3 U41.H5 U41.H12 U41.H13 U41.H14 U41.J1 U41.J2 U41.J3 U41.J12 U41.J13 U41.J14 U41.K1 U41.K2 U41.K3 U41.K6 U41.K7 U41.K10 U41.K12 U41.K13 U41.K14 U41.L1 U41.L2 U41.L3 U41.L12 U41.L13 U41.L14 U41.M1 U41.M2 U41.M3 U41.M7 U41.M8 U41.M9 U41.M10 U41.M11 U41.M12 U41.M13 U41.M14 U41.N1 U41.N3 U41.N6 U41.N7 U41.N8 U41.N9 U41.N10 U41.N11 U41.N12 U41.N13 U41.N14 U41.P1 U41.P2 U41.P7 U41.P8 U41.P9 U41.P10 U41.P11 U41.P12 U41.P13 U41.P14 U42.6 U44.8 U44.9 U45.12 U45.15 U45.16 U46.A3 U46.B3 U46.C4 U47.E2 U47.E4 U48.11 U55.22 U55.28 U55.29 U55.30 U55.32 U55.33 U55.34 U55.36 U55.43 U55.44 U55.45 U55.46 U55.53 U55.54 U55.55 U55.57 U55.58 U55.59 U55.60 U57.11 U57.12 U58.10 U58.11 U59_5V_to_3V3_for_FTDI.6 U59_U_5V_to_3V31.6 U59_U_5V_to_3V32.6 U59_U_5V_to_3V33.6 U60.8 U63.5 U65.1 U69.8 U73.3 U78.3 U78.4 U79.5 U79.6 U79.11 U79.12
copper on no net: | length 7.3
  L1 w0.098: v6(225.091,201.6) 225.591,202.099
  L1 w0.116: 199.987,179.781 v1(200.474,180.269) ; 205.243,187.935 v6(205.933,187.935) ; 205.854,217.78 v2(206.258,218.183) ; 208.877,185.572 v4(209.364,186.06) ; 211.071,218.189 211.468,217.792 v6(211.468,217.79) ; 211.328,189.497 v6(211.815,189.984)
  L5 (Sign) w0.116: v27(206.21,189.395) v27(207.231,188.374)
  L3 (Sign) w0.092: 211.935,218.405 v28(212.331,218.008)
  L3 (Sign) w0.098: 225.942,201.362 226.441,200.863 v28(226.441,200.862)
  other v1: 469.12,228.065 470.22,228.065 471.32,228.065 472.42,228.065 469.12,229.165 470.22,229.165 471.32,229.165 472.42,229.165 469.12,230.265 470.22,230.265 471.32,230.265 472.42,230.265 469.12,231.365 470.22,231.365 471.32,231.365 472.42,231.365
  other v2: 194.907,219.469
  other v3: 397.769,14.173 404.703,14.173 412.069,14.173 419.435,14.173 426.788,14.173 434.154,14.173 441.52,14.173 448.886,14.173 456.252,14.173 463.618,14.173 470.984,14.173 477.906,14.173 485.272,14.173 492.638,14.173 500.004,14.173 507.357,14.173 514.723,14.173 522.089,14.173 529.455,14.173 536.821,14.173 544.187,14.173 484.599,18.11 491.965,18.11 499.331,18.11 506.697,18.11 514.063,18.11 521.429,18.11 528.795,18.11 365.925,19.431 371.297,22.606 534.889,26.273 516.382,26.772 491.149,27.445 498.515,27.445 506.882,27.546 531.012,27.724 363.131,29.273 370.497,29.273 377.863,29.273 385.229,29.273 392.595,29.273 399.961,29.273 407.327,29.273 414.693,29.273 421.615,29.273 428.981,29.273 436.347,29.273 443.713,29.273 451.066,29.273 458.432,29.273 524.713,29.273 465.798,37.998 473.164,37.998 480.53,37.998 487.896,37.998 494.817,37.998 502.183,37.998 509.549,37.998 516.915,37.998 524.281,37.998 531.635,37.998 539.001,37.998 546.367,37.998 553.733,37.998 460.146,73.393 484.518,73.393 507.632,73.393 532.003,73.393 556.387,73.393 580.504,73.393 604.888,73.393 627.99,73.393 651.104,73.393 674.205,73.393 697.319,73.393 720.42,73.393 743.534,73.393 766.635,73.393 437.286,83.629 462.166,83.629 487.058,83.629 510.667,83.629 535.559,83.629 560.438,83.629 585.076,83.629 609.956,83.629 633.578,83.629 657.187,83.629 680.809,83.629 704.418,83.629 728.04,83.629 751.662,83.629 775.271,83.629 362.636,93.866 387.261,93.866 411.899,93.866 436.524,93.866 461.162,93.866 485.788,93.866 510.172,93.866 362.712,95.25 387.35,95.25 411.988,95.25 365.484,103.796 387.769,104.102 412.915,104.102 438.048,104.102 463.182,104.102 488.328,104.102 513.207,104.102 362.712,105.664 387.858,105.664 413.004,105.664 499.605,110.401 522.58,112.344 362.636,114.338 396.405,114.338 506.4,116.599 362.636,176.378 389.052,176.378 415.442,176.378 441.858,176.378 468.274,176.378 494.69,176.378 519.811,176.378 546.227,176.378 572.643,176.378 598.805,176.378 625.196,176.378 650.342,176.378 675.488,176.378 700.608,176.378 725.754,176.378 750.9,176.378 776.046,176.378 801.167,176.378 362.636,186.614 387.782,186.614 412.928,186.614 438.048,186.614 463.194,186.614 488.34,186.614 513.461,186.614 538.607,186.614 563.753,186.614 588.645,186.614 362.636,196.85 395.91,196.85 1269.987,1269.987 1269.987,1269.987 1269.987,1269.987 1269.987,1269.987
  other v16: 207.666,77.658 142.166,102.658 207.666,127.658 292.557,136.121 267.557,201.621 317.557,201.621 58.795,233.154 108.795,233.154 83.795,298.654
  other v20: 214.416,112.658 138.226,164.6 282.557,208.371 93.795,226.404
  other v21: 214.416,92.658 138.226,184.6 302.557,208.371 73.795,226.404
  other v29: 216.776,173.7
  other v31: 200.474,180.269

## Polygon pours and split planes (outlines as drawn)
Vout1_1 on L1 "VOUT1_1_L01_P031" (solid, remove dead copper, pour order 31): 198.844,67.084 211.096,67.084 211.096,91.973 198.619,91.973
eMMC_GND on L1 "EMMC_GND_L01_P032" (solid, remove dead copper, pour order 32): 211.295,44.484 215.995,44.484 215.995,47.461 216.907,47.461 216.907,59.796 214.738,59.796 214.738,63.539 215.445,63.539 215.445,67.103 215.995,67.103 215.995,91.973 211.487,91.973 211.487,67.084 212.495,67.084 212.495,63.539 212.77,63.539 212.77,59.796 210.106,59.796 210.106,47.461 211.254,47.461
Vout2_1 on L1 "VOUT2_1_L01_P030" (solid, remove dead copper, pour order 30): 216.412,67.103 228.867,67.103 228.867,91.992 216.412,91.904
SW2_1 on L1 "SW2_1_L01_P027" (solid, remove dead copper, pour order 27): 225.097,53.499 225.083,53.499 217.455,45.871 217.455,44.86 216.655,44.86 216.655,46.834 217.205,47.384 217.205,60.296 214.999,60.296 214.999,63.039 219.085,63.039 219.085,66.258 225.847,66.258 225.847,60.296 225.097,60.296
SW1_1 on L1 "SW1_1_L01_P025" (solid, remove dead copper, pour order 25): 202.037,53.546 209.616,45.967 209.616,44.959 210.116,44.959 210.216,44.86 210.259,44.902 210.259,46.886 210.076,46.886 209.851,47.111 209.851,53.543 209.851,60.296 212.495,60.296 212.495,63.039 209.383,63.039 209.383,67.696 202.037,67.696
PWR_OUT_20V on L1 "PWR_OUT_20V_L01_P021" (solid, remove dead copper, pour order 21): 102.179,43.118 100.185,41.123 ccw(c101.796,39.512) 99.517,39.512 99.517,39.204 cw(c98.65,39.204) 99.263,38.59 cw(c99.032,38.821) 99.032,38.495 97.259,38.495 ccw(c97.259,35.955) 95.463,37.751 91.927,34.215 cw(c90.131,36.011) 90.131,33.471 76.791,33.471 ccw(c76.791,32.736) 76.272,33.255 cw(c76.167,33.361) 76.167,33.212 71.975,33.212 ccw(c71.975,31.653) 70.872,32.755 70.279,32.162 cw(c68.98,33.461) 68.98,31.624 65.983,31.624 ccw(c65.983,31.582) 65.953,31.612 65.534,31.612 cw(c65.534,32.713) 64.755,31.934 cw(c64.832,32.011) 64.724,32.011 64.724,32.542 63.245,32.542 ccw(c63.245,32.115) 62.943,32.417 62.547,32.021 ccw(c62.636,31.932) 62.511,31.932 62.511,29.286 cw(c62.42,29.286) 62.484,29.221 ccw(c62.826,29.221) 62.826,28.88 64.328,28.88 ccw(c64.328,30.462) 65.91,30.462 cw(c66.36,30.462) 66.36,30.912 69.252,30.912 cw(c69.252,30.521) 69.643,30.521 ccw(c70.704,30.521) 70.704,29.46 92.816,29.46 cw(c92.816,28.27) 94.005,28.27 ccw(c96.404,28.27) 96.404,25.872 230.439,25.872 ccw(c230.439,26.669) 231.237,26.67 231.237,59.525 230.907,59.854 226.058,59.854 225.43,59.226 225.43,50.793 cw(c225.249,50.793) 225.249,50.613 ccw(c225.249,49.818) 224.455,49.818 224.455,35.736 cw(c223.374,35.736) 223.374,34.655 203.844,34.655 cw(c203.844,35.324) 203.176,35.324 203.176,49.157 ccw(c201.761,49.157) 201.761,50.571 201.642,50.571 cw(c201.642,50.818) 201.395,50.818 201.395,53.646 202.051,54.303 202.051,60.241 201.752,60.541 196.547,60.541 195.965,59.959 195.965,37.516 195.965,36.475 cw(c195.165,36.475) 195.165,35.675 184.806,35.675 184.172,35.602 cw(c184.172,38.014) 182.466,36.308 182.466,56.386 182.257,56.596 177.504,56.596 177.485,56.577 177.485,33.805 176.303,32.623 156.332,32.623 155.036,33.92 155.036,56.632 154.837,56.831 145.256,56.831 138.083,62.64 138.07,64.526 137.639,64.957 135.223,64.957 134.939,65.186 132.017,65.186 132.017,52.065 132.335,51.747 134.685,51.747 134.685,37.411 110.955,37.411 110.249,38.026 110.249,50.966 111.933,52.65 112.733,52.65 112.733,64.246 112.173,64.806 107.133,64.806 102.179,59.852
SW2_2 on L1 "SW2_2_L01_P050" (solid, remove dead copper, pour order 50): 176.494,51.025 176.494,56.969 178.468,56.969 178.867,57.368 178.867,62.227 178.077,63.018 174.412,63.018 170.944,59.55 168.022,59.55 167.856,59.384 167.856,57.447 168.249,57.447 169.206,56.49 169.206,51.13
eMMC_GND on L1 "EMMC_GND_L01_P046" (solid, pour order 46): 164.908,40.815 164.908,43.928 163.113,45.723 163.113,56.905 163.311,57.103 163.866,57.103 164.266,57.503 164.266,63.064 162.814,64.516 162.814,90.047 169.247,90.047 169.247,64.516 167.881,63.109 167.695,57.35 167.866,57.179 168.541,57.179 168.801,56.919 168.801,45.068 167.158,43.273 167.158,40.815
SW1_2 on L1 "SW1_2_L01_P047" (solid, remove dead copper, pour order 47): 155.303,51.105 155.303,57.049 153.329,57.049 152.93,57.448 152.93,62.307 153.721,63.097 157.385,63.097 160.853,59.629 163.775,59.629 164.266,59.138 164.266,57.503 163.866,57.103 163.124,57.103 162.591,56.569 162.591,51.21
eMMC_GND on L1 "EMMC_GND_L01_P003" (solid, pour order 3): 121.102,51.746 121.102,75.376 120.127,76.351 120.127,90.808 124.878,90.808 124.878,87.857 124.879,76.468 123.977,75.566 123.977,51.746
SW2 on L1 "SW2_L01_P002" (solid, pour order 2): 132.017,52.283 132.017,71.526 124.57,71.526 124.57,66.585 124.57,52.283
SW1 on L1 "SW1_L01_P000" (solid, pour order 0): 112.916,51.746 112.916,71.526 120.477,71.526 120.477,66.048 120.477,51.746
3.3V_LN_1 on L1 "3.3V_LN_1_L01_P065" (solid, remove dead copper, pour order 65): 293.335,198.481 296.618,198.481 296.618,195.834 296.642,195.81 296.634,195.801 293.335,195.801
eMMC_VccQ on L1 "EMMC_VCCQ_L01_P115" (solid, remove dead copper, pour order 115): 111.756,188.415 111.148,188.415 cw(c111.148,189.22) 110.343,189.22 110.343,189.588 cw(c110.957,189.588) 110.957,190.202 113.453,190.202 cw(c113.453,189.421) 114.234,189.421 114.234,189.058 cw(c113.584,189.058) 113.584,188.409 111.875,188.409 cw(c111.875,189.626)
eMMC_VccQ on L1 "EMMC_VCCQ_L01_P113" (solid, remove dead copper, pour order 113): 110.84,194.647 111.65,194.647 cw(c111.65,194.114) 112.184,194.114 112.184,193.591 cw(c111.64,193.591) 111.64,193.048 111.296,193.048 cw(c111.296,193.552) 110.792,193.552 109.113,193.552 cw(c109.113,193.848) 108.817,193.848 108.817,194.198 cw(c109.267,194.198) 109.267,194.648 110.819,194.648 cw(c110.819,194.182)
5V_RAIL on L1 "5V_RAIL_L01_P111" (solid, remove dead copper, pour order 111): 104.129,199.369 105.932,199.369 cw(c105.932,198.485) 106.816,198.485 106.816,197.135 cw(c106.216,197.135) 106.216,196.535 ccw(c106.216,196.3) 105.981,196.3 105.981,195.638 ccw(c106.567,195.638) 106.567,195.052 cw(c106.567,194.802) 106.817,194.802 106.817,192.548 cw(c106.517,192.548) 106.517,192.248 106.204,192.248 cw(c106.204,193.873) 104.579,193.873 104.579,196.427 ccw(c104.379,196.427) 104.379,196.627 cw(c104.379,196.877) 104.129,196.877
eMMC_Vcc on L1 "EMMC_VCC_L01_P110" (solid, remove dead copper, pour order 110): 117.391,200.376 cw(c117.391,197.898) 119.87,197.898 119.87,196.849 cw(c118.72,196.849) 118.72,195.699 117.4,195.699 cw(c117.4,196.329) 116.77,196.329 116.77,196.565 ccw(c115.798,196.567) 115.8,197.539 cw(c115.728,198.264) 115.728,197.535 114.778,197.535 ccw(c114.778,197.335) 114.578,197.335 cw(c114.478,197.335) 114.478,197.235 112.303,197.235 cw(c112.303,197.989) 111.549,197.989 ccw(c111.428,197.989) 111.428,198.11 110.692,198.11 ccw(c110.667,198.11) 110.667,198.135 109.116,198.135 cw(c109.116,198.435) 108.816,198.435 108.816,198.485 cw(c109.266,198.485) 109.266,198.935 109.651,198.935 ccw(c109.651,199.51) 110.226,199.51 110.226,200.069 cw(c110.533,200.069) 110.533,200.376
no net on L1 "NONET_L01_P109" (solid, pour order 109): 108.816,198.485
V_PoE+ on L1 "V_POE+_L01_P101" (solid, remove dead copper, pour order 101): 27.833,84.726 27.833,89.932 cw(c30.373,89.932) 30.373,92.472 30.458,92.472 cw(c30.458,90.698) 32.233,90.698 32.233,85.692 ccw(c33.147,85.692) 33.147,84.777 36.877,84.777 ccw(c36.877,86.037) 38.136,86.037 38.136,87.344 cw(c38.786,87.344) 38.786,87.994 40.191,87.994 cw(c40.191,87.494) 40.691,87.494 40.691,85.004 cw(c38.151,85.004) 38.151,82.464 30.094,82.464 cw(c30.094,84.726)
1V0@1.5A on L1 "1V0@1.5A_L01_P099" (solid, remove dead copper, pour order 99): 185.259,123.688 186.02,124.45 190.181,124.45 190.346,124.285 190.346,123.785 190.136,123.575 186.465,123.575 185.928,123.038 185.259,123.038
1V8@1.5A on L1 "1V8@1.5A_L01_P098" (solid, remove dead copper, pour order 98): 185.059,128.985 185.76,128.985 186.608,129.833 186.62,129.82 190.181,129.82 190.381,129.62 190.381,128.939 190.044,128.602 186.681,128.602 186.364,128.285 185.076,128.285 185.059,128.268
3V3_Rail on L1 "3V3_RAIL_L01_P097" (solid, remove dead copper, pour order 97): 180.197,124.15 183.459,124.15 183.459,122.674 183.448,122.684 180.197,122.684
3V3_Rail on L1 "3V3_RAIL_L01_P096" (solid, remove dead copper, pour order 96): 180.137,129.168 183.359,129.168 183.359,127.8 183.348,127.81 180.137,127.81
2V5@1.5A on L1 "2V5@1.5A_L01_P094" (solid, remove dead copper, pour order 94): 185.259,133.784 186.391,134.644 190.02,134.644 190.581,134.083 190.581,133.415 190.111,132.945 187.735,132.945 187.446,133.234 185.459,133.234 185.259,133.434
3V3_Rail on L1 "3V3_RAIL_L01_P093" (solid, remove dead copper, pour order 93): 180.147,133.834 180.547,133.834 183.459,133.834 183.459,132.634 183.448,132.645 180.147,132.645
Vout_2_Selector on L1 "VOUT_2_SELECTOR_L01_P092" (solid, remove dead copper, pour order 92): 67.867,32.312 67.867,31.801 65.041,31.801 64.832,32.011 64.832,41.398 65.433,42 69.449,42 71.603,44.154 77.05,44.154 77.31,44.414 89.841,44.414 89.841,41.009 89.382,40.55 69.255,40.555 68.515,41.295 66.76,41.295 66.76,41.25 66.584,41.074 66.584,37.558 66.785,37.358 66.785,33.394
no net on L1 "NONET_L01_P091" (solid, pour order 91): 240.974,253.666 243.299,253.666 243.873,254.24 243.873,254.786 245.114,254.786 245.124,254.776 245.124,254.256 244.955,254.256 244.349,253.65 244.349,252.8 243.716,252.8 242.724,251.808 242.724,251.233 242.849,251.108 241.599,251.108 241.587,251.808
12V_HiSpeed on L1 "12V_HISPEED_L01_P090" (solid, remove dead copper, pour order 90): 241.249,244.523 241.25,244.523 243.512,244.523 243.549,244.561 243.549,245.548 243.35,245.548 242.849,246.048 242.849,247.008 241.599,247.008 241.249,246.658
3.3V_PS_Config on L1 "3.3V_PS_CONFIG_L01_P089" (solid, remove dead copper, pour order 89): 227.389,260.147 227.389,265.23 235.595,265.23 235.82,265.005 235.82,259.846 235.454,259.48 228.057,259.48
US+_Vcc_PS_DDR_504 on L1 "US+_VCC_PS_DDR_504_L01_P088" (solid, remove dead copper, pour order 88): 228.142,237.479 228.264,237.601 233.752,237.601 234.415,236.939 235.697,236.939 235.697,236.489 234.909,235.701 233.564,235.701 233.564,235.532 233.121,235.089 233.121,232.687 233.121,232.686 226.311,232.686 225.275,233.723 225.275,237.479
ADP1741_3.6V on L1 "ADP1741_3.6V_L01_P087" (solid, remove dead copper, pour order 87): 218.502,243.909 218.527,243.934 229.115,243.934 229.115,241.784 223.928,241.784 223.366,241.221 223.366,240.621 218.502,240.621
FPGA_Vcc_HD on L1 "FPGA_VCC_HD_L01_P086" (solid, remove dead copper, pour order 86): 219.871,255.655 222.399,255.655 222.726,255.982 222.726,256.791 225.008,256.791 225.046,256.753 225.046,255.551 225.196,255.401 229.065,255.401 229.065,253.026 229.115,252.976 221.261,252.976 220.621,253.616 220.621,254.216 220.21,254.216 219.871,254.555
NetC616_1 on L1 "NETC616_1_L01_P085" (solid, remove dead copper, pour order 85): 250.396,248.603 250.396,249.303 247.195,249.299 246.968,249.433 246.876,249.433 244.524,249.433 244.524,249.183 246.268,249.183 246.848,248.603
NetC603_1 on L1 "NETC603_1_L01_P084" (solid, remove dead copper, pour order 84): 252.38,250.233 252.373,250.226 247.239,250.226 246.946,249.933 244.524,249.933 244.524,249.683 250.673,249.683 250.83,249.526 250.837,249.533 252.38,249.533
NetC605_1 on L1 "NETC605_1_L01_P083" (solid, remove dead copper, pour order 83): 252.38,250.758 247.301,250.758 246.726,250.183 244.524,250.183 244.524,250.433 246.351,250.433 247.376,251.458 252.38,251.458
NetC612_1 on L1 "NETC612_1_L01_P082" (solid, remove dead copper, pour order 82): 247.914,252.624 250.496,252.624 250.496,251.749 250.492,251.752 246.968,251.752 245.899,250.683 244.524,250.683 244.524,250.933 245.449,250.933 247.126,252.611
NetD19_2 on L1 "NETD19_2_L01_P081" (solid, remove dead copper, pour order 81): 241.424,247.433 240.524,247.433 239.746,246.655 239.746,243.317 239.187,242.759 239.187,240.836 239.949,240.836 239.949,242.106 240.714,242.872 240.714,246.473 241.424,247.183
NetD19_1 on L1 "NETD19_1_L01_P080" (solid, remove dead copper, pour order 80): 238.718,242.908 238.718,240.368 237.452,239.101 234.782,239.101 233.564,239.101 233.564,238.651 233.264,238.351 230.914,238.351 228.314,238.351 228.314,239.051 228.264,239.101 228.264,241.001 229.467,241.001 231.208,242.741 235.72,242.741 237.337,244.359 237.734,245.041 238.668,247.132 239.219,247.683 239.95,247.683 240.2,247.933 241.424,247.933 241.424,247.683 240.724,247.683 240.366,247.682 239.42,246.728 239.42,243.609
NetD16_2 on L1 "NETD16_2_L01_P079" (solid, remove dead copper, pour order 79): 235.887,245.787 236.649,245.787 238.804,247.942 239.904,247.942 240.146,248.183 241.424,248.183 241.424,248.433 240.724,248.433 240.135,248.432 239.842,248.183 237.208,248.183 235.887,247.057
NetD16_1 on L1 "NETD16_1_L01_P078" (solid, remove dead copper, pour order 78): 222.815,248.084 234.634,248.084 235.57,248.808 239.842,248.808 239.967,248.933 241.424,248.933 241.424,248.683 240.724,248.683 240.607,248.565 240.125,248.565 240.059,248.499 236.797,248.499 235.252,246.954 235.252,245.151 231.986,245.151 222.865,245.151
NetD17_1 on L1 "NETD17_1_L01_P077" (solid, remove dead copper, pour order 77): 230.352,249.038 230.14,248.826 222.815,248.826 222.815,251.578 235.252,251.578 235.252,249.793 235.612,249.433 241.424,249.433 241.424,249.183 239.818,249.183 239.673,249.038